# EAGLE board eagle-textsize-huge (EAGLE 9.6.2)

Size 20 x 20 mm. Coordinates in mm from the lower left corner, seen from the top.
Outline: 0,0 20,0 20,20 0,20 0,0
Copper layers used: 

## Footprints (pad centres in the part's own frame; a part is rotated, then mirrored left to right if it is on the bottom)
P = smd 1 x 1: 1 0,0

## Placement (x,y rotation side)
U1  x  [P]  5,5 0 top

## Library data of the parts
U1 = l